# Altium PCB IT_FRONT_PANEL.PcbDoc (part 2 of 2)
Units mm, origin at the board's own origin, x right, y up, seen from the top; angles counter-clockwise.
Board outline 150 x 100 mm, 2 copper layers (Top Layer, Bottom Layer), stack 1.601 mm thick; 78 components, 80 nets, 343 pads, 132 vias.
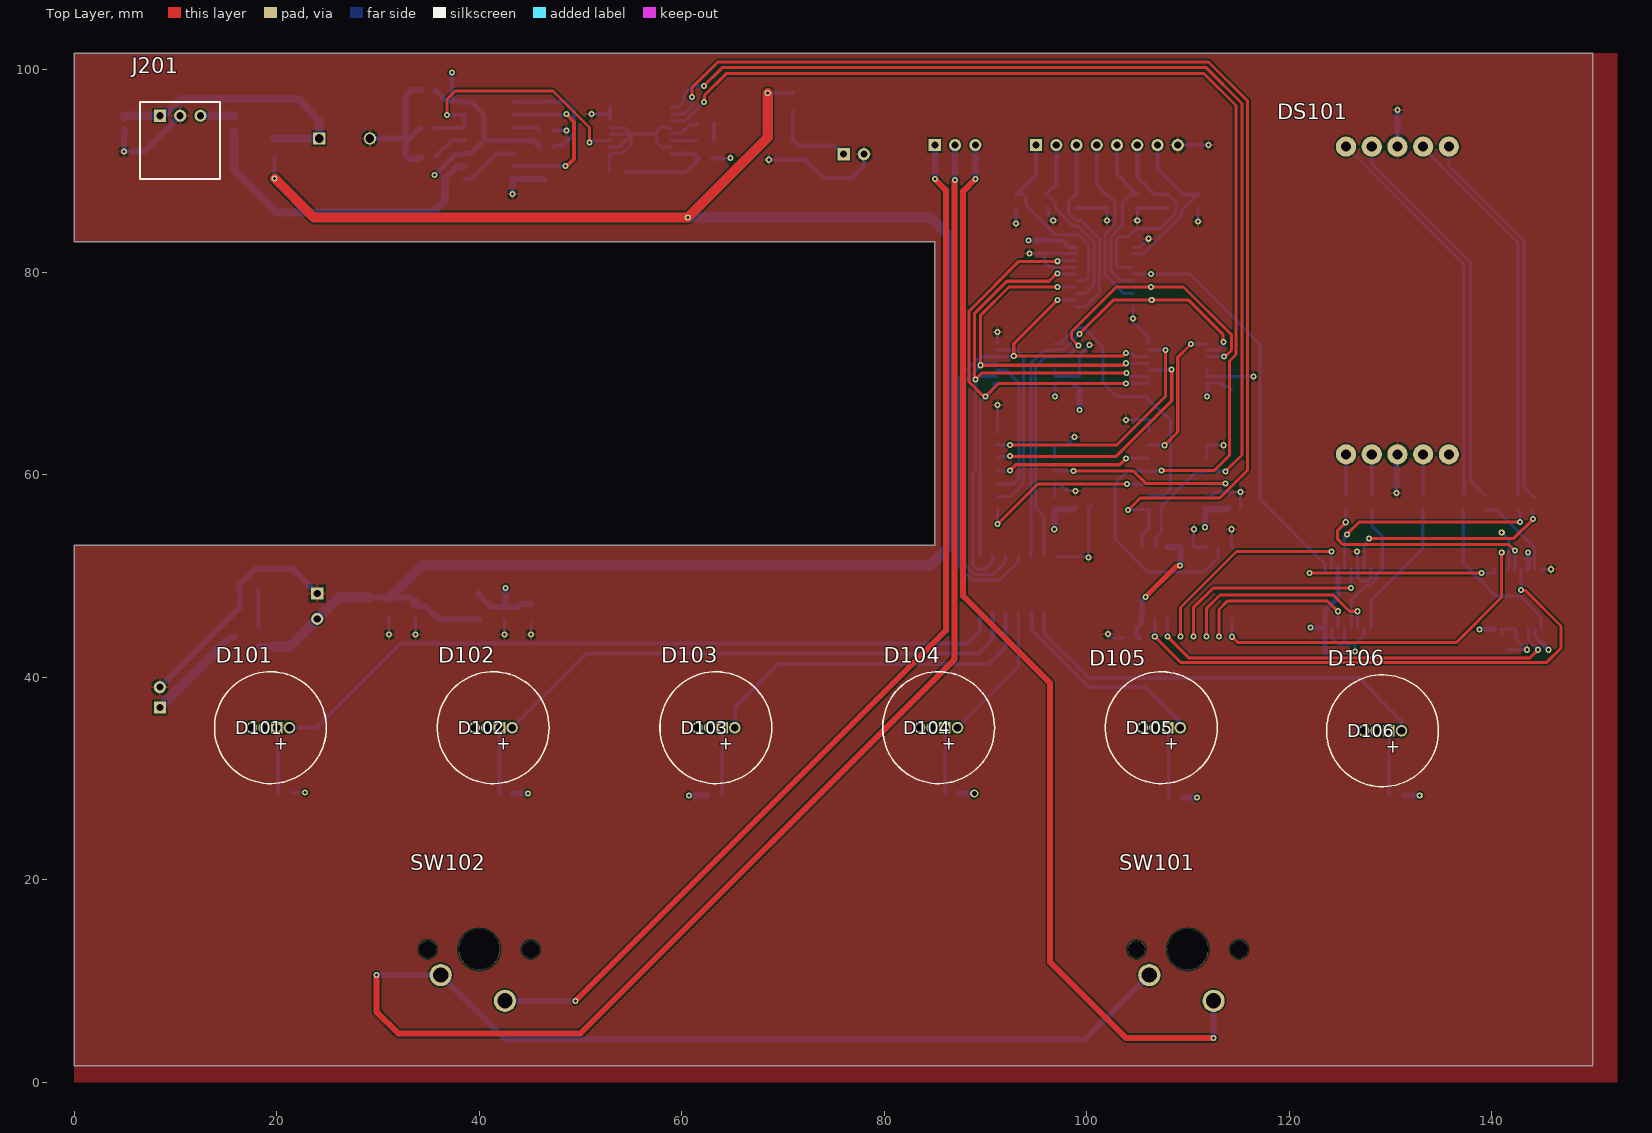
[diagram p0: Top Layer view]

## Via types
v1: diameter 0.6, hole 0.3, Top Layer to Bottom Layer, 131 vias
v2: diameter 0.8, hole 0.5, Top Layer to Bottom Layer, 1 vias

## Nets (pads, with @x,y where several pads share a name; then routed paths per layer and width w, separated by ;. In a path a pad name is that pad's centre, name@x,y a point inside that pad or via, vN(x,y) a via of type N, cw(c..) or ccw(c..) an arc to the next point about the centre after c; other vN are vias at no path point) (continued)
NetU107_11: (continued)
  Top Layer w0.3: v1(111.824,44.004) 111.824,46.757 113.167,48.1 124.363,48.1 125.963,46.5 v1(126.775,46.5)
  Bottom Layer w0.3: U107.11 111.814,45.766 111.814,44.013 v1(111.824,44.004) ; U108.11 v1(126.775,46.5)
NetU107_12: U107.12 U108.5 | length 23
  Top Layer w0.3: v1(110.535,44.004) 110.535,46.835 112.5,48.8 v1(126.125,48.8)
  Bottom Layer w0.3: v1(110.535,44.004) U107.12 ; v1(126.125,48.8) U108.5
NetU107_13: U107.13 U108.2 | length 23.5
  Top Layer w0.3: v1(109.265,44.004) 109.265,46.865 114.8,52.4 v1(124.2,52.4)
  Bottom Layer w0.3: v1(109.265,44.004) U107.13 ; U108.2 124.188,50.762 124.188,52.387 v1(124.2,52.4)
NetU107_14: U107.14 U109.11 | length 42.1
  Top Layer w0.3: v1(107.999,43.991) 110.09,41.9 143.8,41.9 v1(144.6,42.7)
  Bottom Layer w0.3: U107.14 107.997,45.773 107.997,43.993 v1(107.999,43.991) ; U109.11 143.65,44.675 143.65,43.65 v1(144.6,42.7)
NetU107_15: U107.15 U109.5 | length 53.2
  Top Layer w0.3: v1(106.725,44) 109.275,41.45 145.45,41.45 146.854,42.854 146.854,45.046 143.33,48.57 142.93,48.57 v1(142.9,48.6)
  Bottom Layer w0.3: v1(106.725,44) U107.15 ; v1(142.9,48.6) 142.913,48.612 142.913,50.638 U109.5
NetU201_5: U201.5 U201.8 | length 6
  Bottom Layer w0.4: U201.8 39.21,89.19 41.75,91.73 U201.5
PAIR1_H: U104.3 U105.3 | length 14.5
  Bottom Layer w0.3: U104.3 91.171,70.309 92.052,70.309 93.3,69.061 93.3,59.6 92.795,59.095 U105.3
PAIR1_L: U103.3 U105.5 | length 25
  Top Layer w0.3: v1(92.407,61.823) 92.42,61.81 102.91,61.81 108.404,67.304 108.404,70.392 v1(108.396,70.4)
  Bottom Layer w0.3: U105.5 91.343,61.803 92.388,61.803 v1(92.407,61.823) ; U103.3@106.13,70.35 108.319,70.35 108.369,70.4 v1(108.396,70.4)
PAIR2_H: U104.6 U105.2 | length 18.5
  Bottom Layer w0.3: U104.6 93.049,72.3 93.75,71.599 93.75,59.125 92.45,57.825 U105.2
PAIR2_L: U103.6 U105.6 | length 24.9
  Top Layer w0.3: v1(92.414,62.923) 97.612,62.923 97.632,62.903 102.957,62.903 107.792,67.738 107.792,70.65 107.8,70.658 v1(107.8,72.3)
  Bottom Layer w0.3: U105.6 91.184,62.914 92.406,62.914 v1(92.414,62.923) ; U103.6@106.13,72.3 v1(107.8,72.3)
PAIR3_H: U104.8 U106.2 | length 27.1
  Bottom Layer w0.3: U104.8 97.45,72.95 99,74.5 99.7,74.5 101.61,72.59 101.61,69.077 102.987,67.7 105.9,67.7 108.3,65.3 108.3,58.6 107.642,57.942 106.292,57.942 U106.2
PAIR3_L: U103.8 U106.6 | length 14.2
  Top Layer w0.3: v1(107.7,62.9) 109,64.2 109,71.6 v1(110.3,72.9)
  Bottom Layer w0.3: U106.6 106.177,62.903 107.698,62.903 v1(107.7,62.9) ; v1(110.3,72.9) 110.309,72.909 111.829,72.909 U103.8@111.87,72.95
REF_SET: J105.1 SW102.1 | length 107.1
  Top Layer w0.6: v1(49.5,8) 86.1,44.6 86.1,88.1 v1(85,89.2)
  Bottom Layer w0.6: SW102.1 49.48,8.02 v1(49.5,8) ; v1(85,89.2) J105.1
RISK_MEM_DISP_CENTER: J106.6 R118.1 U101.4 | length 20.3
  Bottom Layer w0.3: U101.4 103.116,80.477 102.941,80.653 102.941,83.224 103.252,83.535 104.153,83.535 104.904,84.286 107.269,84.286 108.81,85.827 108.81,86.943 108.077,87.677 R118.1 R118.1@107.923,87.677
  Bottom Layer w0.4: J106.6 105,89.4 106.723,87.677 R118.1@107.923,87.677
RISK_MEM_DISP_LEFT: J106.7 R117.1 U101.2 | length 16.5
  Bottom Layer w0.3: U101.2 105.573,81.777 109.364,85.568 109.364,86.117 110.923,87.677 R117.1
  Bottom Layer w0.4: J106.7 107,90.2 109.523,87.677 R117.1@110.923,87.677
RISK_MEM_DISP_RIGHT: J106.5 R119.1 U101.6 | length 17.1
  Bottom Layer w0.3: 104.377,87.677 103.53,86.83 103.53,84.65 102.387,83.507 102.387,80.113 103.323,79.177 U101.6
  Bottom Layer w0.4: J106.5 103,89.677 104.794,87.883 104.794,87.806 104.859,87.741 104.923,87.677 R119.1 ; 104.377,87.677 R119.1@104.794,87.677
RISK_MEM_TILT_LEFT: J106.4 R120.1 U101.8 | length 17.6
  Bottom Layer w0.3: R120.1@101.923,87.677 102.077,87.677 102.81,86.943 102.81,84.713 101.833,83.736 101.833,79.74 103.695,77.877 U101.8
  Bottom Layer w0.4: J106.4 101,88.6 R120.1@101.923,87.677
RISK_MEM_TILT_RIGHT: J106.3 R121.1 U101.11 | length 19.4
  Bottom Layer w0.3: U101.11 99.838,76.577 101.279,78.018 101.279,83.321 99.5,85.1 98.917,85.1 98.19,85.827 98.19,86.943 98.923,87.677 R121.1
  Bottom Layer w0.4: R121.1 J106.3
RISK_MEM_VIBRATION: J106.2 R122.1 U101.13 | length 18.6
  Bottom Layer w0.3: R122.1 96.077,87.677 96.913,86.84 96.913,86.32 98.687,84.546 99.153,84.546 100.725,82.974 100.725,78.764 99.838,77.877 U101.13
  Bottom Layer w0.4: R122.1 97,88.677 J106.2
SEG_A: R110.2 U108.4 | length 22.3
  Top Layer w0.3: v1(125.7,54.1) 126.9,55.3 v1(142.8,55.3)
  Bottom Layer w0.3: U108.4 125.488,50.762 125.488,53.86 125.7,54.073 v1(125.7,54.1) ; R110.2 142.8,56.3 v1(142.8,55.3)
SEG_B: R111.2 U108.7 | length 21
  Top Layer w0.3: v1(127.9,53.7) 142.2,53.7 v1(144.1,55.6)
  Bottom Layer w0.3: U108.7 127.412,50.763 127.412,52.831 127.454,52.873 127.454,53.173 127.9,53.619 v1(127.9,53.7) ; v1(144.1,55.6) R111.2
SEG_C: R112.2 U108.9 | length 13.9
  Bottom Layer w0.3: U108.9 128.075,47.538 133.2,52.663 R112.2
SEG_D: R113.2 U108.12 | length 13.7
  Bottom Layer w0.3: U108.12 126.125,47.579 127.596,49.05 127.986,49.05 128.6,49.664 128.6,50.054 129.2,50.654 129.2,53.9 128.2,54.9 R113.2
SEG_E: R114.2 U109.4 | length 23.1
  Top Layer w0.3: v1(125.593,55.293) 124.8,54.5 124.8,53.6 125.3,53.1 141.7,53.1 v1(142.3,52.5)
  Bottom Layer w0.3: v1(125.593,55.293) 125.593,56.593 R114.2 ; U109.4 142.288,50.662 142.288,52.487 v1(142.3,52.5)
SEG_F: R115.2 U109.7 | length 8.5
  Bottom Layer w0.3: R115.2 140.5,56.5 144.225,52.775 U109.7
SEG_G: R116.2 U109.9 | length 16.3
  Bottom Layer w0.3: R116.2 137.2,51.246 140.463,47.982 142.822,47.982 144.875,45.929 U109.9
SENSOR_CTRL_5V: J105.2 SW101.2 SW102.2 | length 209.3
  Top Layer w0.6: v1(29.84,10.56) 29.84,6.96 32,4.8 50,4.8 86.954,41.754 86.954,89.054 v1(87,89.1)
  Bottom Layer w0.6: v1(29.84,10.56) SW102.2 42.55,4.2 99.83,4.2 SW101.2 ; v1(87,89.1) J105.2
SENSOR_FAULT: J106.1 R123.1 U101.15 | length 19.9
  Bottom Layer w0.3: R123.1 93.208,87.677 93.723,87.677 94,87.4 94,86.6 96.905,83.695 99.221,83.695 100.171,82.745 100.171,79.51 99.923,79.262 99.838,79.262 99.753,79.177 U101.15@98.978,79.177
  Bottom Layer w0.4: R123.1@93.077,87.677 93.208,87.808 95,89.6 J106.1
SENSOR_FAULT_BUF: U101.5 U108.1 U109.1 | length 60.8
  Top Layer w0.3: v1(122,50.271) 122.014,50.286 138.986,50.286 v1(139,50.3)
  Bottom Layer w0.3: U101.5 v1(106.373,79.827) 110.173,79.827 117.1,72.9 117.1,57.6 123.4,51.3 123.45,51.3 123.525,51.225 U108.1 123.525,50.346 123.45,50.271 v1(122,50.271) ; v1@139.027,50.3 140.25,50.3 140.325,50.375 U109.1
SERVO_PWM: R206.1 U201.9 | length 31.4
  Bottom Layer w0.6: 36.6,89.22 37.84,90.46 U201.9
  Bottom Layer w0.8: R206.1 15.8,90.1 20,85.9 35.4,85.9 36.6,87.1 36.6,89.22
SUM12_B0: U105.4 U106.5 | length 15.5
  Top Layer w0.3: v1@92.4,60.379 v1(92.407,60.386) 92.994,60.973 103.273,60.973 v1(103.9,61.6)
  Bottom Layer w0.3: U105.4 91.186,60.376 92.397,60.376 v1(92.407,60.386) ; v1(103.9,61.6) 103.935,61.635 U106.5
SUM12_B1: U105.1 U106.3 | length 18.1
  Top Layer w0.3: v1(91.2,55.1) 95.175,59.075 v1(103.991,59.075)
  Bottom Layer w0.3: U105.1 91.2,56.53 v1(91.2,55.1) ; v1(103.991,59.075) 106.155,59.075 U106.3
SUM12_B2: U105.13 U106.14 | length 19.3
  Top Layer w0.3: v1(98.7,60.365) 104.616,60.365 105.881,59.1 v1(113.7,59.1)
  Bottom Layer w0.3: U105.13 v1(98.7,60.365) ; U106.14 111.827,59.097 113.697,59.097 v1(113.7,59.1)
TILT_LEFT_BUF: U101.12 U102.4 U103.5 U104.5 | length 55.4
  Top Layer w0.3: v1(97.1,77.227) 92.8,72.927 v1(92.8,71.7) 103.519,71.7 103.819,72 v1(103.9,72)
  Bottom Layer w0.3: v1(92.8,71.7) 92.775,71.675 91.155,71.675 91.123,71.643 89.494,71.643 87.4,69.549 87.4,50.882 88.694,49.588 91.428,49.588 93.265,51.425 U102.4 ; v1(97.1,77.227) U101.12 ; v1(103.9,72) 103.957,71.943 104.507,71.943 104.8,71.65 U103.5@106.13,71.65
TILT_RIGHT_BUF: U101.9 U102.5 U103.9 U104.9 | length 46.8
  Top Layer w0.3: v1(99.3,73.9) 102.627,77.227 v1(106.427,77.227) 110.073,77.227 113.45,73.85 113.45,73.15 v1(113.5,73.1)
  Bottom Layer w0.3: U102.5 94.488,51.972 94.488,70.971 95.776,72.259 96.829,72.259 96.925,72.355 97.755,72.355 v1(99.3,73.9) ; U101.9 v1(106.427,77.227) ; U103.9@111.866,72.292 112.999,72.292 113.443,72.736 113.443,73.043 v1(113.5,73.1)
VIBRATION_BUF: U101.7 U102.6 U103.10 U104.10 | length 51.4
  Top Layer w0.3: v1(99.197,72.742) 98.5,73.438 98.5,74.1 102.927,78.527 v1(106.373,78.527) 109.573,78.527 114.3,73.8 114.3,72.291 113.659,71.65 v1(113.578,71.65)
  Bottom Layer w0.3: U102.6 95.805,55.882 94.95,56.737 94.95,70.65 95.909,71.609 96.829,71.609 U104.10 98.105,71.65 v1(99.197,72.742) ; U101.7 v1(106.373,78.527) ; U103.10@111.87,71.65 v1(113.578,71.65)
pads on no net: D101.3 D101.4 D102.3 D102.4 D103.3 D103.4 D104.3 D104.4 D105.3 D105.4 D106.3 D106.4 DS101.5 SW101. SW102. U101.3 U102.9 U102.10 U103.11 U104.11 U105.9 U105.10 U106.9 U106.10 U109.12

## Polygon pours and split planes (outlines as drawn)
GND on Top Layer "GND_L01_P-001" (solid, remove dead copper, pour order 2): 0,0 152.4,0 152.4,101.6 0,101.6 0,83 85,83 85,53 0,53
+5V_LOGIC on Bottom Layer "GND_L01_P-001" (solid, remove dead copper, pour order 3): 0.057,0.115 152.457,0.115 152.457,101.715 0.057,101.715 0.057,83.115 85.057,83.115 85.057,53.115 0.057,53.115

## Silkscreen, mask and mechanical layers (free items; w line width, h text height)
Mechanical 1:
  lines w0.254: 0,53 85,53 85,83 0,83

## Text inside footprints (layer, text, board x,y; h text height)
D101: Top Overlay "+" at 19.683,32.841 h1.27; Mechanical 13 "+" at 19.683,32.841 h1.27; Bottom Overlay "+" at 19.683,32.841 h1.27
D102: Top Overlay "+" at 41.682,32.841 h1.27; Mechanical 13 "+" at 41.682,32.841 h1.27; Bottom Overlay "+" at 41.682,32.841 h1.27
D103: Top Overlay "+" at 63.682,32.841 h1.27; Mechanical 13 "+" at 63.682,32.841 h1.27; Bottom Overlay "+" at 63.682,32.841 h1.27
D104: Top Overlay "+" at 85.683,32.841 h1.27; Mechanical 13 "+" at 85.683,32.841 h1.27; Bottom Overlay "+" at 85.683,32.841 h1.27
D105: Top Overlay "+" at 107.682,32.841 h1.27; Mechanical 13 "+" at 107.682,32.841 h1.27; Bottom Overlay "+" at 107.682,32.841 h1.27
D106: Top Overlay "+" at 129.532,32.541 h1.27; Mechanical 13 "+" at 129.532,32.541 h1.27; Bottom Overlay "+" at 129.532,32.541 h1.27